# Altium PCB Counts_PCB.PcbDoc (part 3 of 3)
Units mil, origin at the board's own origin, x right, y up, seen from the top; angles counter-clockwise.
Board outline 3474.97 x 2159.98 mil, 2 copper layers (Top Layer, Bottom Layer); 185 components, 97 nets, 569 pads, 211 vias.
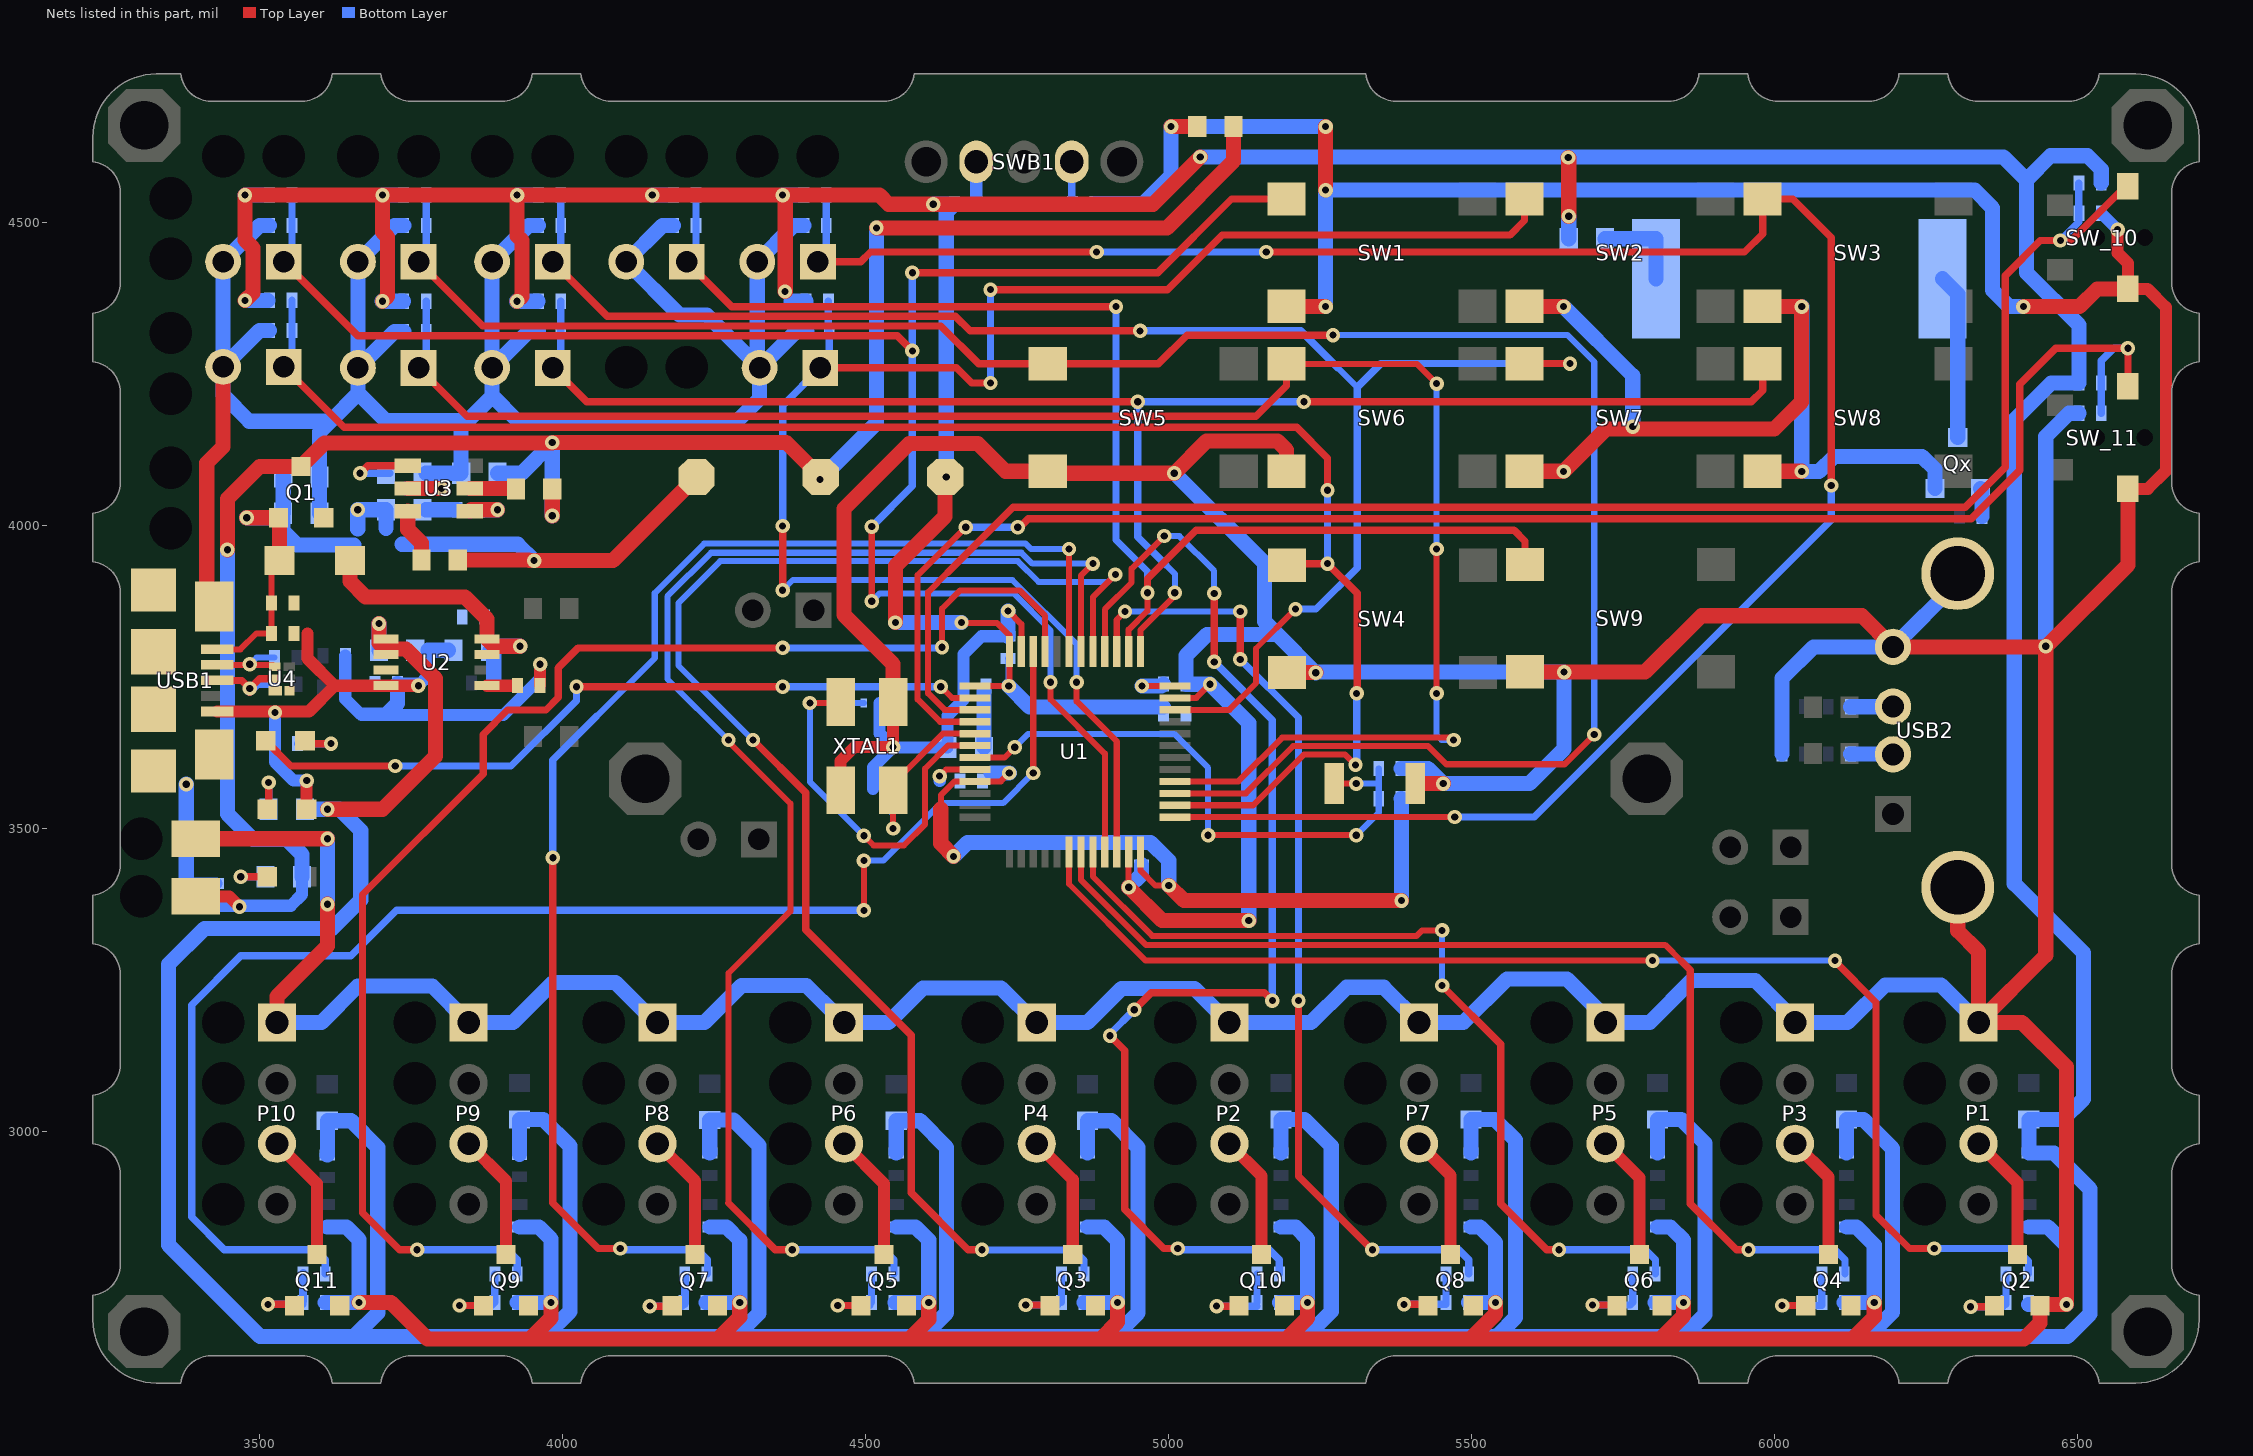
[diagram p2: the nets of this part, all layers, seen from the top]

## Via types
v1: diameter 23.62, hole 11.81, Top Layer to Bottom Layer, 211 vias

## Nets (pads, with @x,y where several pads share a name; then routed paths per layer and width w, separated by ;. In a path a pad name is that pad's centre, name@x,y a point inside that pad or via, vN(x,y) a via of type N, cw(c..) or ccw(c..) an arc to the next point about the centre after c; other vN are vias at no path point) (continued)
GND: C1.1 C2.2 C3.2 C4.2 C5.2 C6.2 C7.2 C8.2 C9.2 C10.2 C11.2 C12.2 C13.2 C14.2 C15.2 C16.2 C17.2 C18.1 C19.2 C20.2 C21.2 C22.2 C23.2 C24.2 C100.2 C101.2 C102.2 C103.2 C104.2 C105.2 C106.2 C107.2 C108.2 C109.2 C110.2 C111.2 C112.2 C113.2 C114.2 C115.2 C116.2 C117.2 C118.2 C119.2 C120.2 CF1.2 CF2.2 LED2.2 P1.1 P2.1 P3.1 P4.1 P5.1 P6.1 P7.1 P8.1 P9.1 P10.1 P15.2 P16.2 Q2.2 Q3.2 Q4.2 Q5.2 Q6.2 Q7.2 Q8.2 Q9.2 Q10.2 Q11.2 Qx.2 R1.1 R3.1 R4.1 R8.2 R10.1 R32.1 R34.1 R36.1 R38.1 R40.1 R42.1 R44.1 R46.1 R48.1 R50.1 SW1.3 SW2.3 SW3.3 SW4.3 SW5.3 SW6.3 SW7.3 SW8.3 SW9.3 SW_1.2 SW_2.2 SW_3.2 SW_4.2 SW_5.2 SW_6.2 SW_7.2 SW_8.2 SW_9.2 SW_10.2 SW_11.2 SWR2.1 U1.8 U1.23 U1.35 U1.47 U2.4 U3.5 U4.3 U4.4 USB1.5 USB1.MP1 USB1.MP2 USB1.MP3 USB1.MP4 USB1.MP5 USB1.MP6 USB2.4 USB2.MH1 USB2.MH2 XTAL1.2 XTAL1.4 | length 27664.6
  Top Layer w10: v1(4622,3586.41) 4632.99,3597.4 U1.8@4680,3597.4 ; v1(4735,3859) 4756.77,3837.23 U1.47@4756.77,3792.28 ; v1@4933.94,3403.13 U1.23@4933.94,3461.57 ; U1.35@5010.71,3715.51 5045.51,3715.51 v1(5068,3738)
  Top Layer w20: USB1.5@3430.32,3693.07 v1@3525.51,3693.07 ; v1@3526,3693.56 v1@3525.51,3693.07 ; LED2.2@3577.48,3531.85 3577.48,3578.48 v1(3578,3579) ; 3578.99,3822.01 3578.99,3780.62 3624,3735.61 ; v1(3762,3735.61) U2.4@3708.54,3735.61 3624,3735.61 ; C1.1@3962.5,3736 3962.5,3770.5 v1(3963,3771) ; XTAL1.4@4458.69,3563.17 4458.69,3611.69 4481.31,3634.31 v1(4545.31,3634.31) XTAL1.2@4545.31,3708.83 ; v1(6565.5,4488) 6565.5,4449.5 6582.44,4432.56 SW_10.2@6582.44,4390.35 6614.65,4390.35 6645,4360 6645,4090 6615.35,4060.35 SW_11.2@6582.44,4060.35 ; v1@3525.51,3693.07 3581.46,3693.07 3624,3735.61
  Top Layer w25: P15.2@3394.79,3483.01 v1(3612,3483) ; USB1.MP1@3425.39,3866.3 3413,3878.69 3413,4103 3439.94,4129.94 SW_4.2@3439.94,4261.5 ; P10.1@3528.89,3180 3528.89,3222.89 3612,3306 v1(3612,3375) ; v1(3664,2718) 3717,2718 3777,2658 3946,2658 ; U3.5@3744.66,4061 v1(3800,4061) ; v1(3980.66,2718) 3980.66,2692.66 3946,2658 ; v1(4292.33,2718) 4292.33,2694.33 4256,2658 ; XTAL1.2@4545.31,3708.83 4545.31,3771.69 4464.44,3852.56 4464.44,4027.44 4572,4135 4685,4135 4730.58,4089.42 SW5.3@4800.52,4089.42 4803.94,4086 v1(5009,4086) 5062.5,4139.5 5179.5,4139.5 5194.37,4124.63 SW6.3@5194.37,4089.42 ; v1(4604,2718) 4604,2690 4572,2658 ; v1(4915.66,2718) 4915.66,2685.66 4888,2658 ; v1(4934,3403.13) 4989.13,3348 v1(5132,3348) ; v1(5004,4658) P16.2@5044,4658 ; SW1.3@5194.37,4361.42 v1@5258.44,4361.42 ; SW4.3@5195.09,3757.42 v1@5242.57,3757.42 ; v1(5229,2718) 5229,2692.63 5194.37,2658 ; v1(5258.85,4553.15) v1(5258.85,4658) ; SWR2.1@5406.93,3574 v1(5453,3574) ; v1(5539,2718) 5539,2699 5498,2658 ; SW7.3@5587.09,4089.42 v1@5651.15,4089.42 ; SW2.3@5587.09,4361.42 v1@5651.15,4361.42 ; SW9.3@5587.8,3758.42 v1@5651.87,3758.42 ; v1(5651.57,4089) 5721.57,4159 5999,4159 6043.87,4203.87 6043.87,4361.42 SW3.3@5979.8,4361.42 ; v1(5652.28,3758) 5786,3758 5879,3851 6143.59,3851 USB2.4@6195,3799.59 v1@6447,3799.59 ; v1(5849,2718) 5849,2696 5811,2658 ; SW8.3@5979.8,4089.42 v1@6043.87,4089.42 ; v1(6164,2718) 6164,2694 6128,2658 ; USB2.MH1@6301.69,3403.13 6301.69,3331.31 6336.11,3296.89 P1.1@6336.11,3180 ; v1(6410,4361) 6502.44,4361 6531.8,4390.35 SW_10.2@6582.44,4390.35 ; SW_11.2@6582.44,4060.35 6582.44,3935.03 v1@6447,3799.59 ; 3946,2658 4256,2658 ; 4256,2658 4572,2658 ; 4572,2658 4888,2658 ; 4888,2658 5194.37,2658 ; 5194.37,2658 5498,2658 ; 5498,2658 5811,2658 ; 5811,2658 6128,2658 ; 6128,2658 6411,2658 6437.4,2684.4 Q2.2@6437.4,2712.68 6439.72,2715 v1(6481,2715) 6481,3107 6408,3180 P1.1@6336.11,3180 ; P1.1@6336.11,3180 6447,3290.89 v1@6447,3799.59
  Bottom Layer w20: C20.2@3379,3409.5 C19.2@3429,3409.5 ; v1(3525.51,3691.51) R10.1@3525.51,3640 3525.51,3609.49 3556,3579 v1(3578,3579) ; C23.2@3641.5,3785 3641.5,3713.5 3665,3690 3711,3690 ; 3668,3687 3902,3687 3963,3748 v1(3963,3771) ; C7.2@3727.5,3739 3758.61,3739 v1(3762,3735.61) 3778,3751.61 3778,3794 ; C10.2@4512.01,3565 4512.01,3601.01 v1(4545.31,3634.31) ; C9.2@4522.99,3707 4522.99,3656.62 v1(4545.31,3634.31) ; v1@4622,3578.41 v1@4622.25,3578.66 ; C16.2@4735,3817.16 4691.16,3817.16 4661.5,3787.5 C11.2@4661.5,3735.2 4661.5,3712.5 4635,3686 C15.2@4635,3633.66 4545.95,3633.66 v1(4545.31,3634.31) ; C109.2@6538.5,4515 v1(6565.5,4488)
  Bottom Layer w25: C20.2@3379,3409.5 v1(3379,3573) ; C103.2@3516.5,4321.5 3499.94,4321.5 SW_4.2@3439.94,4261.5 ; C100.2@3516.5,4495 3499.94,4495 SW_1.2@3439.94,4435 SW_4.2@3439.94,4261.5 ; P10.1@3528.89,3180 3602,3180 3662,3240 3785,3240 P9.1@3845,3180 3918.11,3180 3984.11,3246 4087,3246 4153,3180 P8.1@4156.67,3180 4234.22,3180 4295.22,3241 4402,3241 4450.78,3192.22 4465,3192.22 4477.22,3180 4537.56,3180 4594.56,3237 4723.56,3237 P4.1@4780.56,3180 ; R1.1@3598.89,4020 3599.06,4020.17 C3.2@3599.06,4080 3599.06,4154.06 3617,4172 ; R50.1@3608.5,2718 v1(3664,2718) 3664,2822 3643.5,2842.5 C120.2@3611.64,2842.5 ; v1(3612,3375) v1(3612,3483) ; 3711,3690 3727.5,3706.5 C7.2@3727.5,3739 ; C105.2@3738,4320 3722.44,4320 SW_6.2@3662.44,4260 ; C104.2@3738,4495 3722.44,4495 SW_5.2@3662.44,4435 SW_6.2@3662.44,4260 ; C4.2@3774.66,4026 R4.1@3826.16,4026 ; R3.1@3774.66,4086 C2.2@3832.66,4086 3832.66,4161.66 3844,4173 ; 3778,3794 C6.2@3812,3794 ; R46.1@3925.16,2718 v1(3980.66,2718) 3980.66,2823.03 3961.19,2842.5 C119.2@3929.25,2842.5 ; C107.2@3960,4320 3943.69,4320 SW_8.2@3883.69,4260 ; C106.2@3960,4495 3943.69,4495 SW_7.2@3883.69,4435 SW_8.2@3883.69,4260 ; C108.2@4183,4495 4164.94,4495 SW_9.2@4104.94,4435 4192.94,4347 4237.94,4347 SW_2.2@4321.19,4263.75 ; R42.1@4236.83,2718 v1(4292.33,2718) 4292.33,2820.67 4270.5,2842.5 C118.2@4242.92,2842.5 ; C102.2@4398,4495 4381.19,4495 SW_3.2@4321.19,4435 SW_2.2@4321.19,4263.75 ; C101.2@4403,4320 4384.94,4320 SW_2.2@4324.94,4260 ; R38.1@4548.5,2718 v1(4604,2718) 4604,2821 4582.5,2842.5 C117.2@4550.69,2842.5 ; C16.2@4735,3817.16 v1(4735,3859) ; P4.1@4782.22,3180 4866,3180 4922,3236 5042.33,3236 P2.1@5098.33,3180 ; R34.1@4860.16,2718 v1(4915.66,2718) 4915.66,2820.34 4893.5,2842.5 C116.2@4865.97,2842.5 ; R8.2@4878.5,4531 4958,4531 5004,4577 v1(5004,4658) v1(5258.85,4658) ; v1(4934,3403.13) 4955,3424.13 C12.2@4955,3440.16 ; v1(5009,4086) 5010,4086 5158,3938 5158,3841.57 5179.57,3820 ; P2.1@5100,3180 5235,3180 5293,3238 5354.78,3238 P7.1@5412.78,3180 5485.89,3180 5557.89,3252 5656.89,3252 P5.1@5728.89,3180 ; v1(5132,3348) 5132,3674 v1(5068,3738) 5029.16,3738 C14.2@5028.5,3738.66 5028.5,3785.5 5063,3820 5179.57,3820 ; R48.1@5182.5,2718 v1(5229,2718) 5229,2823 5209.5,2842.5 C115.2@5185.25,2842.5 ; v1(5258.85,4361) v1(5258.85,4553.15) 6329.85,4553.15 6359,4524 6359,4388 6386,4361 v1(6410,4361) ; C18.1@5383.5,3599 5428,3599 v1(5453,3574) 5595,3574 5652.28,3631.28 v1(5652.28,3758) 5243.57,3758 v1(5242.57,3757) 5179.57,3820 ; R44.1@5494.5,2718 v1(5539,2718) 5539,2817 5513.5,2842.5 C114.2@5498.53,2842.5 ; v1(5651.57,4361) 5765.5,4247.07 v1(5765.5,4163) ; P5.1@5720.56,3180 P5.1@5728.89,3180 ; R40.1@5802.5,2718 v1(5849,2718) 5849,2821 5827.5,2842.5 C113.2@5806.31,2842.5 ; CF1.2@6012,3623 CF2.2@6012,3701.25 6012,3748 6063.59,3799.59 USB2.4@6195,3799.59 6301.69,3906.28 USB2.MH2@6301.69,3920.46 ; P3.1@6033.33,3180 P3.1@6036.67,3180 ; v1(6044.28,4361) v1(6044.28,4089) 6073,4089 6098,4114 6243,4114 6264.3,4092.7 Qx.2@6264.3,4060.68 ; R36.1@6114.5,2718 v1(6164,2718) 6164,2813 6134.5,2842.5 C112.2@6118.58,2842.5 ; P1.1@6336.11,3180 6274.11,3242 6182,3242 6120,3180 P3.1@6036.67,3180 ; R32.1@6418.5,2715 v1(6481,2715) 6481,2812 6450.5,2842.5 C111.2@6418.75,2842.5 ; v1(6447,3800.59) 6447,4147 6485,4185 C110.2@6501.5,4185 ; SW_4.2@3439.94,4261.5 3439.94,4215.06 3483,4172 3617,4172 ; 3617,4172 3662.44,4217.44 3662.44,4218.56 ; 3662.44,4218.56 3708,4173 3844,4173 ; 3662.44,4218.56 SW_6.2@3662.44,4260 ; 3844,4173 3883.69,4212.69 3883.69,4214.31 ; 3883.69,4214.31 SW_8.2@3883.69,4260 ; 3883.69,4214.31 3926,4172 4288,4172 4324.94,4208.94 SW_2.2@4324.94,4260 ; SW_2.2@4321.19,4263.75 SW_2.2@4324.94,4260 ; P5.1@5728.89,3180 5793.67,3180 5862.67,3249 5967.67,3249 P3.1@6036.67,3180
ISET: R3.2 U3.4 | length 132.5
  Top Layer w12: v1(3666,4086) 3678.4,4098.4 U3.4@3744.66,4098.4
  Bottom Layer w12: v1(3666,4086) R3.2@3714.66,4086
LCTRL1: R31.1 U1.18 | length 2123.2
  Top Layer w10: U1.18@4835.51,3461.57 4835.51,3408.49 4962,3282 v1(5798,3282) v1@5798,3284
  Top Layer w12: v1@6098.61,3281.39 6167,3213 6167,2862 6222,2807 v1(6263,2807)
  Bottom Layer w10: v1(5798,3282) v1(6099.22,3282)
  Bottom Layer w12: v1(6263,2807) 6398,2807 6418.5,2786.5 R31.1@6418.5,2765
LCTRL2: R35.1 U1.19 | length 1815.8
  Top Layer w10: U1.19@4855.2,3461.57 4855.2,3415.14 4962.33,3308 5819,3308 5846,3281
  Top Layer w12: 5846,3281 5860.56,3266.44 5860.56,2880.99 5936.56,2805 v1(5956.56,2805)
  Bottom Layer w12: v1(5956.56,2805) 6099.22,2805 6115.72,2788.5 R35.1@6115.72,2765
LCTRL3: R39.1 U1.20 | length 1469.2
  Top Layer w10: U1.20@4874.88,3461.57 4874.88,3420.83 4972.71,3323 5409,3323 5418,3332 v1(5451,3332)
  Top Layer w12: v1(5451,3241) 5547.78,3144.22 5547.78,2880.99 5623.78,2805 v1(5643.78,2805)
  Bottom Layer w10: v1(5451,3241) v1(5451,3332)
  Bottom Layer w12: v1(5643.78,2805) 5786.44,2805 5802.94,2788.5 R39.1@5802.94,2765
LCTRL4: R43.1 U1.39 | length 1595.7
  Top Layer w10: U1.39@4914.25,3792.28 4914.25,3844.25 v1(4928,3858)
  Top Layer w12: v1(5118,3779) v1(5118,3858) ; v1(5214,3216) 5214,2926.25 5335.25,2805 v1(5336,2805)
  Bottom Layer w10: v1(4928,3858) v1(5118,3858) v1@5119,3858
  Bottom Layer w12: v1(5118,3779) 5214,3683 v1(5214,3216) ; v1(5336,2805) 5478.67,2805 5495.17,2788.5 R43.1@5495.17,2765
LCTRL5: R47.1 U1.40 | length 1999.8
  Top Layer w10: U1.40@4894.57,3792.28 4894.57,3861.57 4938.89,3905.89 4938.89,3928.89 v1(4992.5,3982.5)
  Top Layer w12: v1(4903,3158) 4927.23,3133.77 4927.23,2871.77 4992,2807 v1(5015,2807) ; v1(4943,3201) 4971,3229 5158,3229 v1(5171,3216) ; v1(5075,3775) v1(5075,3888)
  Bottom Layer w10: v1(4992.5,3982.5) 5017.5,3982.5 5075,3925 v1(5075,3888)
  Bottom Layer w12: v1(4903,3158) 4903,3161 v1(4943,3201) ; v1(5015,2807) 5017,2805 5165.89,2805 5182.39,2788.5 R47.1@5182.39,2765 ; v1(5075,3775) 5171,3679 v1(5171,3216)
LCTRL6: R33.1 U1.41 | length 2397.4
  Top Layer w10: U1.41@4874.88,3792.28 4874.88,3881.88 v1(4912,3919)
  Top Layer w12: v1(4314,3646) 4401,3559 4401,3333 4575,3159 4575,2899 4669,2805 v1(4692,2805)
  Bottom Layer w10: v1(4314,3646) 4191,3769 4191,3872 4260,3941 4751.2,3941 4785.2,3907 4900,3907 v1(4912,3919)
  Bottom Layer w12: v1(4692,2805) 4692.5,2804.5 4843.61,2804.5 4860.11,2788 R33.1@4860.11,2764.5
LCTRL7: R37.1 U1.42 | length 2357.3
  Top Layer w10: 4273.67,2882.33 4273.67,3261.42 4375.78,3363.53 4375.78,3541.22 4273.67,3643.33 v1(4273.67,3646) ; U1.42@4855.2,3792.28 4855.2,3917.32 v1(4874.88,3937)
  Top Layer w12: 4273.67,2882.33 4351,2805 v1(4379,2805)
  Bottom Layer w10: v1(4273.67,3646) 4173,3746.67 4173,3883 4245,3955 4757,3955 4775,3937 v1(4874.88,3937) ; v1@4872.88,3941 v1@4874.88,3943
  Bottom Layer w12: v1(4379,2805) 4530.33,2805 4546.83,2788.5 R37.1@4546.83,2765
LCTRL8: R41.1 U1.43 | length 2283.1
  Top Layer w10: U1.43@4835.51,3792.28 v1(4835.51,3961)
  Top Layer w12: v1(3983.9,3451.9) 3983.9,2882.1 4059,2807 v1(4095,2807)
  Bottom Layer w10: 4056,3685 4152,3781 4152,3888.46 4233.54,3970 4764,3970 4773,3961 v1(4835.51,3961)
  Bottom Layer w12: v1(3983.9,3451.9) 3983.9,3612.9 4056,3685 ; v1(4095,2807) 4097,2805 4222.56,2805 4239.06,2788.5 R41.1@4239.06,2765
LCTRL9: R45.1 U1.45 | length 2346.9
  Top Layer w10: v1(4626,3799) 4626,3863 4656,3893 4754,3893 4796.14,3850.86 U1.45@4796.14,3792.28
  Top Layer w12: v1(3760,2805) 3731,2805 3670,2866 3670,3391 3868.94,3589.94 3868.94,3655.28 3909.16,3695.5 3972.5,3695.5 3993,3716 3993,3765 4026,3798 v1(4363,3798)
  Bottom Layer w12: v1(3760,2805) 3908.66,2805 3925.16,2788.5 R45.1@3925.16,2765 ; v1(4363,3798) v1@4623,3798
LCTRL10: R49.1 U1.46 | length 2420.2
  Top Layer w10: v1@4496,3365 4497,3366 v1(4497,3447) ; v1(4776.46,3591.72) U1.46@4776.46,3792.28
  Bottom Layer w10: v1@4495,3447 v1(4497,3447) 4529,3447 4624,3542 4726.74,3542 v1(4776.46,3591.72)
  Bottom Layer w12: R49.1@3608.5,2765 3608.5,2788.5 3592,2805 3442,2805 3388,2859 3388,3209 3469,3290 3651,3290 3726,3365 v1@4496,3365
  other v1: 4497,3365
LED1#: P1.3 Q2.3 | length 209.1
  Top Layer w20: P1.3@6336.11,2980 6400,2916.11 Q2.3@6400,2797.32
LED2#: P3.3 Q4.3 | length 205.5
  Top Layer w20: P3.3@6033.33,2980 6088.33,2925 Q4.3@6088.33,2797.32
LED3#: P5.3 Q6.3 | length 205.9
  Top Layer w20: P5.3@5720.56,2980 5776.66,2923.89 Q6.3@5776.66,2797.32
LED4#: P7.3 Q8.3 | length 204.3
  Top Layer w20: P7.3@5412.78,2980 5465,2927.78 Q8.3@5465,2797.32
LED5#: P2.3 Q10.3 | length 204.8
  Top Layer w20: P2.3@5100,2980 5153.33,2926.67 Q10.3@5153.33,2797.32
LED6#: P4.3 Q3.3 | length 207.3
  Top Layer w20: P4.3@4782.22,2980 4841.66,2920.56 Q3.3@4841.66,2797.32
LED7#: P6.3 Q5.3 | length 209.8
  Top Layer w20: P6.3@4464.44,2980 4530,2914.45 Q5.3@4530,2797.32
LED8#: P8.3 Q7.3 | length 208.2
  Top Layer w20: P8.3@4156.67,2980 4218.33,2918.34 Q7.3@4218.33,2797.32
LED9#: P9.3 Q9.3 | length 208.2
  Top Layer w20: P9.3@3845,2980 3906.66,2918.34 Q9.3@3906.66,2797.32
LED10#: P10.3 Q11.3 | length 210.1
  Top Layer w20: P10.3@3528.89,2980 3594.99,2913.9 Q11.3@3594.99,2797.32
NetC1_2: C1.2 U2.5 | length 48.6
  Top Layer w20: U2.5@3875.46,3735.61 C1.2@3924.11,3735.61
NetLED1_2: LED1.2 R10.2 | length 100.6
  Top Layer w12: LED1.2@3575,3645 3580,3640 v1(3618,3640)
  Bottom Layer w12: R10.2@3562.51,3640 v1(3618,3640)
NetLED2_1: LED2.1 R5.1 | length 100.7
  Top Layer w12: LED2.1@3512.52,3531.85 3509,3535.37 3515,3541.37 v1(3515,3576)
  Bottom Layer w12: R5.1@3509,3537.85 R5.1@3515,3531.85 v1(3515,3576)
NetLED3_1: LED3.1 R6.1 | length 84.5
  Top Layer w12: v1(3469,3420.5) LED3.1@3512.52,3420.5
  Bottom Layer w12: v1(3469,3420.5) R6.1@3510,3420.5
NetLS1_1: LS1.1 Rv.1 | length 150
  Bottom Layer w25: Rv.1@5720,4473 5804,4473 LS1.1@5804,4407
NetLS1_2: LS1.2 Qx.3 | length 272.1
  Bottom Layer w25: LS1.2@6276.44,4407 6301.7,4381.74 Qx.3@6301.7,4145.32
NetQ2_1: Q2.1 R31.2 R32.2 | length 188.1
  Top Layer w12: v1@6324,2711 Q2.1@6361.94,2711
  Bottom Layer w12: v1(6323,2711) R32.2@6376.16,2711 ; R32.2@6381.16,2716 R31.2@6381.16,2763 ; R32.2@6381.5,2715 R31.2@6381.5,2765
NetQ3_1: Q3.1 R33.2 R34.2 | length 138.1
  Top Layer w12: v1@4765,2714 Q3.1@4802.94,2714
  Bottom Layer w12: v1(4764,2714) R34.2@4817.16,2714 ; R34.2@4823.16,2718 R33.2@4823.16,2765
NetQ4_1: Q4.1 R35.2 R36.2 | length 155.4
  Top Layer w12: v1@6013,2713 Q4.1@6050.94,2713
  Bottom Layer w12: v1(6012,2713) 6077.5,2713 R36.2@6077.5,2718 R35.2@6077.5,2765
NetQ5_1: Q5.1 R37.2 R38.2 | length 138.1
  Top Layer w12: v1@4455,2713 Q5.1@4492.94,2713
  Bottom Layer w12: v1(4454,2713) R38.2@4507.16,2713 ; R38.2@4509.5,2718 R37.2@4509.5,2765
NetQ6_1: Q6.1 R39.2 R40.2 | length 158.8
  Top Layer w12: v1@5700,2714 Q6.1@5737.94,2714
  Bottom Layer w12: v1@5703,2718 v1(5699,2714) 5761.5,2714 R40.2@5765.5,2718 R39.2@5765.5,2765
NetQ7_1: Q7.1 R41.2 R42.2 | length 188.1
  Top Layer w12: v1@4145,2712 Q7.1@4182.94,2712
  Bottom Layer w12: v1(4144,2712) R42.2@4197.16,2712 ; R42.2@4201.5,2715 R41.2@4201.5,2765 ; R42.2@4202.16,2717 R41.2@4202.16,2764
NetQ8_1: Q8.1 R43.2 R44.2 | length 154.4
  Top Layer w12: v1@5389,2715 Q8.1@5426.94,2715
  Bottom Layer w12: v1(5388,2715) R44.2@5457.5,2715 ; R44.2@5457.5,2718 R43.2@5457.5,2765
NetQ9_1: Q9.1 R45.2 R46.2 | length 148
  Top Layer w12: v1(3830,2713) 3831,2713 3868.94,2713 Q9.1@3869.26,2712.68
  Top Layer w20: v1@3830,2714 v1@3831,2713
  Bottom Layer w12: v1(3830,2713) 3883.16,2713 R46.2@3888.16,2718 R45.2@3888.16,2765
NetQ10_1: Q10.1 R47.2 R48.2 | length 151.4
  Top Layer w12: v1@5080,2712 Q10.1@5117.94,2712
  Bottom Layer w12: v1(5079,2712) R48.2@5145.5,2712 ; R48.2@5145.5,2718 R47.2@5145.5,2765
NetQ11_1: Q11.1 R49.2 R50.2 | length 188.1
  Top Layer w12: v1@3515,2715 Q11.1@3552.94,2715
  Bottom Layer w12: v1(3514,2715) R50.2@3567.16,2715 ; R50.2@3571.5,2715 R49.2@3571.5,2765 ; R50.2@3572.16,2720 R49.2@3572.16,2767
NetQx_1: Qx.1 Rb.1 | length 46.7
  Bottom Layer w25: Qx.1@6339.1,4060.68 6341.5,4058.28 Rb.1@6341.5,4015
NetR7_1: R7.1 SWB1.1 | length 70.4
  Bottom Layer w12: R7.1@4682.52,4530.98 R7.1@4683.5,4530
  Bottom Layer w20: R7.1@4682.52,4530.98 SWB1.1@4682.52,4600
NetR8_1: R8.1 SWB1.3 | length 69.6
  Bottom Layer w12: SWB1.3@4840,4600 4840,4532.5 R8.1@4841.5,4531
NetRF1_2: RF1.2 USB2.2 | length 70.2
  Bottom Layer w25: RF1.2@6125,3623 6194.43,3623 USB2.2@6195,3622.43
NetRF2_2: RF2.2 USB2.3 | length 70.1
  Bottom Layer w25: RF2.2@6125,3701 6194.83,3701 USB2.3@6195,3701.17
NetSB6_1: SB6.1 U3.2 | length 72.8
  Top Layer w25: U3.2@3847.02,4061 3917,4061 SB6.1@3919,4063
NetSB7_2: SB7.2 U3.6 | length 89.9
  Top Layer w25: U3.6@3744.66,4023.6 3744.66,3993.34 3767,3971 SB7.2@3767,3943
RST#: C18.2 R9.1 SWR2.2 U1.7 | length 981.1
  Top Layer w10: U1.7@4680,3617.09 4729.09,3617.09 v1(4746,3634) ; v1(5065,3489) v1(5309.31,3489) v1@5312,3489 ; SWR2.2@5273.07,3574 v1(5309.31,3574)
  Bottom Layer w10: v1(4746,3634) 4768,3656 5009,3656 5065,3600 v1(5065,3489) ; v1(5309.31,3489) 5346.5,3526.19 R9.1@5346.5,3549 5346.5,3574 ; v1(5309.31,3574) 5346.5,3574 ; C18.2@5346.5,3599 5346.5,3574
TEST#: LED1.1 U1.2 | length 1262.8
  Top Layer w10: v1(4624,3734) 4642.49,3715.51 U1.2@4680,3715.51
  Top Layer w12: LED1.1@3510.04,3645 3552.04,3603 v1(3724,3603) ; v1(4023,3734) v1(4363,3734)
  Bottom Layer w12: v1(3724,3603) 3915,3603 4023,3711 v1(4023,3734) ; v1(4363,3734) v1(4624,3734)
TS: R4.2 U3.1 | length 76.1
  Top Layer w25: U3.1@3847.02,4023.6 3849.42,4026 v1(3892.66,4026)
  Bottom Layer w25: R4.2@3863.16,4026 v1(3892.66,4026)
TS_1: C100.1 R53.1 SW1.1 SW_1.1 U1.21 | length 3169.2
  Top Layer w10: v1(4510,3875) v1(4510,3998) ; v1(4805,3741.2) 4805,3713 4894.57,3623.43 U1.21@4894.57,3461.57
  Top Layer w12: SW_1.1@3539.94,4435 3661.94,4313 4552,4313 v1(4577,4288) ; v1(4577,4417) 4982,4417 5103.58,4538.58 SW1.1@5194.37,4538.58
  Bottom Layer w10: v1(4510,3875) 4523,3888 4744,3888 4805,3827 v1(4805,3741.2)
  Bottom Layer w12: SW_1.1@3539.94,4435 3553.5,4448.56 C100.1@3553.5,4495 R53.1@3553.5,4545 ; v1(4510,3998) 4577,4065 v1(4577,4288) ; v1@4577,4292 v1@4577,4411
TS_2: C101.1 R54.1 SW2.1 SW_2.1 U1.22 | length 2826.2
  Top Layer w10: v1(4848,3741.2) 4848,3710 4914.25,3643.75 U1.22@4914.25,3461.57
  Top Layer w12: v1(4363,3999) 4363,3897.21 v1@4367.21,3893 ; SW_2.1@4424.94,4260 4650,4260 4675,4235 v1(4706,4235) ; v1(4706,4389) 4998,4389 5088,4479 5563,4479 5587.09,4503.09 SW2.1@5587.09,4538.58
  Bottom Layer w10: v1(4363,3893) 4380,3910 4741.8,3910 4848,3803.8 v1(4848,3741.2)
  Bottom Layer w12: v1(4363,3999) 4363,4198.06 SW_2.1@4424.94,4260 4440,4275.06 C101.1@4440,4320 4438.5,4321.5 R54.1@4438.5,4370 ; v1(4706,4235) v1(4706,4389)
TS_3: C102.1 R55.1 SW3.1 SW_3.1 U1.25 | length 3642
  Top Layer w10: U1.25@5010.71,3518.66 5471.66,3518.66 v1(5472,3519)
  Top Layer w12: SW_3.1@4421.19,4435 4492,4435 4508,4451 v1(4881,4451) ; v1(5161,4451) 5950,4451 5979.8,4480.8 SW3.1@5979.8,4538.58 6029.42,4538.58 6093,4475 v1(6093,4066)
  Bottom Layer w12: SW_3.1@4421.19,4435 4435,4448.81 C102.1@4435,4495 R55.1@4435,4545 ; v1(4881,4451) v1(5161,4451) ; v1(5472,3519) 5603,3519 6093,4009 v1(6093,4066)
TS_4: C103.1 R56.1 SW4.1 SW_4.1 U1.26 | length 2834
  Top Layer w10: U1.26@5010.71,3538.35 5139.35,3538.35 5223,3622 5291,3622 v1(5308,3605)
  Top Layer w12: SW_4.1@3539.94,4261.5 3639.44,4162 5211,4162 5262,4111 v1(5262,4058) ; SW4.1@5195.09,3934.58 5197.51,3937 v1(5262,3937) 5311,3888 v1@5311,3723
  Bottom Layer w12: SW_4.1@3539.94,4261.5 3553.5,4275.06 C103.1@3553.5,4321.5 R56.1@3553.5,4371.5 ; v1(5262,3937) v1(5262,4058) ; v1(5308,3605) 5310,3607 v1(5310,3723)
TS_5: C104.1 R57.1 SW5.1 SW_5.1 U1.27 | length 3533.7
  Top Layer w10: U1.27@5010.71,3558.03 5127.03,3558.03 5205,3636 5428,3636 5458,3606 5653,3606 v1(5702,3655)
  Top Layer w12: SW_5.1@3762.44,4435 3868.44,4329 4624,4329 4686.42,4266.58 SW5.1@4800.52,4266.58 4982.58,4266.58 5030,4314 v1(5271,4314)
  Bottom Layer w10: v1(5271,4314) 5658,4314 5702,4270 v1(5702,3655)
  Bottom Layer w12: SW_5.1@3762.44,4435 3775,4447.56 C104.1@3775,4495 R57.1@3775,4545
TS_6: C105.1 R58.1 SW6.1 SW_6.1 U1.28 | length 3000.7
  Top Layer w10: U1.28@5010.71,3577.72 5114.72,3577.72 5187,3650 5466,3650 v1(5470,3646) ; SW6.1@5194.37,4266.58 5409.42,4266.58 v1(5442,4234) ; v1(5442,3723) v1(5442,3961)
  Top Layer w12: SW_6.1@3762.44,4260 3842.44,4180 5144,4180 5194.37,4230.37 SW6.1@5194.37,4266.58
  Bottom Layer w10: v1(5442,3723) 5442,3654 5450,3646 v1(5470,3646) ; v1(5442,3961) v1(5442,4234)
  Bottom Layer w12: SW_6.1@3762.44,4260 3775,4272.56 C105.1@3775,4320 R58.1@3775,4370
TS_7: C106.1 R59.1 SW7.1 SW_7.1 U1.34 | length 2699.6
  Top Layer w10: U1.34@5010.71,3695.83 5099.83,3695.83 5144,3740 5144,3797 v1(5209,3862)
  Top Layer w12: SW_7.1@3983.69,4435 4073.69,4345 4648,4345 4672,4321 v1(4952.8,4321) ; SW7.1@5587.09,4266.58 5587.51,4267 v1(5662,4267)
  Bottom Layer w10: 5279,4260 5311,4228
  Bottom Layer w12: SW_7.1@3983.69,4435 3997,4448.31 C106.1@3997,4495 R59.1@3997,4545 ; v1(4952.8,4321) 5218,4321 5279,4260 ; v1(5209,3862) 5243.11,3862 5311,3929.89 5311,4228 5350,4267 v1(5662,4267)
TS_8: C107.1 R60.1 SW8.1 SW_8.1 U1.37 | length 2646.7
  Top Layer w10: U1.37@4953.62,3792.28 4953.62,3827.82 5010,3884.2 v1(5010,3888.94)
  Top Layer w12: SW_8.1@3983.69,4260 4039.69,4204 v1(4949,4204) ; v1(5223,4204) 5961,4204 5979.8,4222.8 SW8.1@5979.8,4266.58
  Bottom Layer w10: 4995,3935 5010,3920 v1(5010,3888.94)
  Bottom Layer w12: SW_8.1@3983.69,4260 3997,4273.31 C107.1@3997,4320 R60.1@3997,4370 ; 4995,3935 4949,3981 v1(4949,4204) v1(5223,4204)
TS_9: C108.1 R61.1 SW9.1 SW_9.1 U1.38 | length 2183
  Top Layer w10: U1.38@4933.94,3792.28 4933.94,3827.94 4965,3859 v1(4965,3888.94)
  Top Layer w12: SW_9.1@4204.94,4435 4278.94,4361 v1(4913,4361) ; v1(4965,3888.94) 4965,3912 5045,3992 5569.8,3992 5587.8,3974 SW9.1@5587.8,3935.58
  Bottom Layer w12: SW_9.1@4204.94,4435 4220,4450.06 C108.1@4220,4495 R61.1@4220,4545 ; v1(4913,4361) 4913,3976 4965,3924 v1(4965,3888.94)
TS_10: C109.1 R62.1 SW_10.1 U1.3 | length 2804.8
  Top Layer w10: 4635.46,3922.46 4603,3890 4603,3723 4630.17,3695.83 U1.3@4680,3695.83
  Top Layer w12: 4635.46,3922.46 4743,4030 6314,4030 6380,4096 6380,4412 6438,4470 v1(6471,4470) 6489,4470 6578.65,4559.65 SW_10.1@6582.44,4559.65
  Bottom Layer w12: v1(6471,4470) 6501.5,4500.5 C109.1@6501.5,4515 R62.1@6501.5,4565
TS_11: C110.1 R63.1 SW_11.1 U1.4 | length 2751
  Top Layer w10: v1(4665,3997) 4585.84,3917.84 4585.84,3713.16 4622.86,3676.14 U1.4@4680,3676.14
  Top Layer w12: v1@4754,3997 4768,4011 6324,4011 6404,4091 6404,4233 6463.44,4292.44 v1(6582.44,4292.44) SW_11.1@6582.44,4229.65
  Bottom Layer w12: v1(4665,3997) v1(4751,3997) v1@4754,3997 ; C110.1@6538.5,4185 R63.1@6538.5,4235 6538.5,4271.5 6559.44,4292.44 v1(6582.44,4292.44)
USB_D+: R52.2 U4.2 USB1.3 | length 156.7
  Top Layer w10: USB1.3@3430.32,3744.25 USB1.3@3433.07,3747.01
  Top Layer w12: USB1.3@3430.32,3744.25 3470.75,3744.25 v1(3484,3731) 3500.01,3747.01 U4.2@3525,3747.01 ; v1@3484,3725 v1@3484,3725.14
  Bottom Layer w12: v1@3484,3725 3497,3738 R52.2@3524.5,3738
USB_D-: R51.2 U4.1 USB1.2 | length 141
  Top Layer w10: USB1.2@3430.32,3769.84 3521.85,3769.84 U4.1@3525,3766.69
  Bottom Layer w10: v1(3484,3771) 3495,3782 R51.2@3524.5,3782
VBAT: C2.1 C19.1 C20.1 P12.1 P15.1 P16.1 Q1.3 R6.2 SB6.2 | length 3477
  Top Layer w20: P15.1@3394.79,3388.01 3449.99,3388.01 v1(3467,3371)
  Top Layer w25: v1(3447,3960) 3447,4044 3500.32,4097.32 Q1.3@3568.53,4097.32 3607.21,4136 v1@3983,4136 ; v1(3983,4016) SB6.2@3983,4060 ; v1(3983,4137) 4369,4137 P12.1@4426,4080 ; v1(4518,4491) 4997,4491 5107,4601 P16.1@5107,4658
  Bottom Layer w12: C20.1@3379,3372.5 C19.1@3429,3372.5
  Bottom Layer w20: C19.1@3429,3372.5 3551.5,3372.5 3570,3391 R6.2@3570,3420.5
  Bottom Layer w25: v1(3447,3960) 3447,3524 3489,3482 3545,3482 3570,3457 R6.2@3570,3420.5 ; C2.1@3892.66,4086 3932,4086 v1(3983,4137) v1(3983,4016) ; v1(4424.94,4076) 4518,4169.06 v1(4518,4491)
VCC_3V3: C7.1 C8.1 C11.1 C12.1 C13.1 C14.1 C15.1 C16.1 C17.1 P11.1 R5.2 R7.2 R9.2 R11.2 R12.2 R13.2 R14.2 R15.2 R16.2 R17.2 R18.2 R19.2 R20.2 R21.2 R22.2 R23.2 R24.2 R25.2 R26.2 R27.2 R28.2 R29.2 R30.2 R53.2 R54.2 R55.2 R56.2 R57.2 R58.2 R59.2 R60.2 R61.2 R62.2 R63.2 Rv.2 U1.1 U1.9 U1.24 U1.36 U1.48 U2.1 U2.2 U2.3 | length 18596.5
  Top Layer w10: 4624,3532 4624,3555 4646.72,3577.72 U1.9@4680,3577.72 4723,3577.72 v1(4737,3591.72) ; v1@4658,3839 4717,3839 4737.09,3818.91 U1.48@4737.09,3792.28 4737.09,3736.28 v1(4736,3735.2) U1.1@4680,3735.2 ; v1@4950,3735.2 4953.62,3731.57 4957.24,3735.2 U1.36@5010.71,3735.2 ; U1.24@4953.62,3461.57 4953.62,3430.38 4978,3406 v1(5000,3406)
  Top Layer w25: v1(3476,4371) 3489,4384 3489,4458 3476,4471 v1(3476,4545) v1(3703,4545) ; v1(3612,3531.85) 3702.85,3531.85 3790.31,3619.31 3790.31,3747.34 3741.65,3796 3721,3796 ; v1(3697,3838) 3697,3806 3707,3796 ; v1(3703,4370) 3711,4378 3711,4476 3703,4484 v1(3703,4545) ; v1(3925,4370) 3933,4378 3933,4470 3925,4478 v1(3925,4545) ; v1(4367,4386) 4367.21,4386.21 4367.21,4540.79 v1(4363,4545) ; v1(4549,3840) 4549,3933 4631,4015 P11.1@4631,4080 ; 4624,3532 4624,3475 v1(4645,3454) ; v1(5000,3406) 5025,3381 v1(5384,3381) ; v1(5052,4608) 4974,4530 v1(4611.5,4530) 4537.58,4530 4522.58,4545 v1(4363,4545) ; v1(5659,4607) 5660,4606 v1(5660,4510) ; v1(3703,4545) v1(3925,4545) ; v1(3925,4545) v1(4148,4545) v1(4363,4545)
  Bottom Layer w10: 4722,3735.2 v1(4736,3735.2) 4736,3779.16 C16.1@4735,3780.16
  Bottom Layer w25: v1(3476,4545) R53.2@3516.5,4545 ; v1@3479,4371 R56.2@3514,4371 ; R5.2@3575,3531.85 v1(3612,3531.85) 3632.15,3531.85 3667,3497 3667,3382 3620,3335 3409,3335 3350,3276 3350,2813 3501,2662 3656,2662 ; R29.2@3611.64,2961.5 3611.89,2961.75 R30.2@3611.89,3018 3651,3018 3695,2974 3695,2701 3656,2662 ; C8.1@3697,3794 v1(3697,3838) ; v1@3702,4370 v1(3703,4370) R58.2@3737,4370 ; v1(3703,4545) R57.2@3738,4545 ; v1@3924,4370 v1(3925,4370) R60.2@3959,4370 ; v1(3925,4545) R59.2@3960,4545 ; R27.2@3929,2962.5 R28.2@3929,3020 3968.11,3020 4012.11,2976 4012.11,2703 3973.11,2664 ; v1(4148,4545) R61.2@4183,4545 ; R25.2@4242.67,2964.5 R26.2@4242.67,3019 4281.78,3019 4324,2976.78 4324,2700.22 4286.78,2663 ; v1(4363,4545) R55.2@4398,4545 ; 4377,4370 R54.2@4401.5,4370 ; v1(4549,3840) v1(4658,3840) ; R23.2@4550.44,2964.5 R24.2@4550.44,3018 4589.56,3018 4633.56,2974 4633.56,2701 4594.56,2662 ; v1(4611.5,4530) R7.2@4646.5,4530 4633,4516.5 v1(4633,4080) ; v1@4645.05,3453.95 4668.27,3477.16 C12.1@4955,3477.16 4969.84,3477.16 5000,3447 v1(5000,3406) ; C15.1@4695,3633.66 C11.1@4695,3726 ; 4707.28,3591.72 v1(4737,3591.72) ; v1(4736,3735.2) 4770.54,3700.66 C17.1@4991.5,3700.66 ; R21.2@4866.22,2964.5 R22.2@4866.22,3018 4905.33,3018 4949.33,2974 4949.33,2701 4910.33,2662 ; v1@4955.8,3735 v1(4956,3735.2) 4988.04,3735.2 C14.1@4991.5,3738.66 ; v1(5052,4608) 6377,4608 6415,4570 ; R19.2@5185,2964.5 R20.2@5185,3020 5224.11,3020 5268.11,2976 5268.11,2703 5229.11,2664 ; R9.2@5383.5,3549 5384,3548.5 v1(5384,3381) ; R17.2@5498.78,2964.5 R18.2@5498.78,3020 5537.89,3020 5572,2985.89 5572,2693.11 5542.89,2664 ; Rv.2@5660,4473 v1(5660,4510) ; R15.2@5806.56,2964.5 R16.2@5806.56,3020 5845.67,3020 5885,2980.67 5885,2698.33 5850.67,2664 ; R13.2@6118.33,2964.5 R14.2@6118.33,3020 6146,3020 6194,2972 6194,2702 6154,2662 ; R62.2@6538.5,4565 6538.5,4587.5 6516,4610 6455,4610 6415,4570 ; 3656,2662 4594.56,2662 ; 4594.56,2662 4910.33,2662 ; 4910.33,2662 6154,2662 ; 6154,2662 6483,2662 6520,2699 6520,2905 6460.5,2964.5 R11.2@6419,2964.5 R12.2@6419,3020 6475,3020 6509,3054 6509,3295 6395,3409 6395,4174 6456,4235 R63.2@6501.5,4235 6501.5,4330.5 6415,4417 6415,4570
VIN: C5.1 C6.1 D1.2 Q1.2 R2.2 U2.7 U2.8 | length 488.3
  Top Layer w25: D1.2@3649.07,3942 3649.07,3907.93 3675,3882 3839,3882 3875.46,3845.54 U2.8@3875.46,3812.39 3887.26,3800.59 v1(3930,3800.59)
  Bottom Layer w25: R2.2@3886.5,3740 3886.5,3787.5 C6.1@3880,3794 3886.59,3800.59 v1(3930,3800.59)
VUSB: C3.1 C4.1 C21.1 C22.1 D1.1 P13.1 Q1.1 R1.2 SB7.1 USB1.1 | length 1418.2
  Top Layer w10: USB1.1@3430.32,3795.43 3468.43,3795.43 3495.01,3822.01 C22.1@3520,3822.01 C21.1@3520,3872.01 3520,3929.07 D1.1@3532.93,3942
  Top Layer w25: v1(3479,4012.68) Q1.1@3531.13,4012.68 3532.93,4010.87 D1.1@3532.93,3942 ; SB7.1@3827,3943 3944,3943 3945,3942 v1(3953,3942) 4083,3942 P13.1@4221,4080
  Bottom Layer w25: v1(3479,4012.68) 3531.57,4012.68 R1.2@3538.89,4020 ; C3.1@3539.06,4080 3539.06,4020.17 R1.2@3538.89,4020 ; 3656,3968 3562,3968 3538.89,3991.11 R1.2@3538.89,4020 ; 3662,3994 v1(3662,4026) C4.1@3708.66,4026 3708.66,3995.34 ; 3735,3969 3926,3969 v1(3953,3942)
X0: C10.1 U1.5 XTAL1.1 | length 311.1
  Top Layer w10: v1(4545.31,3500) XTAL1.1@4545.31,3563.17 4545.31,3574.31 4627.46,3656.46 U1.5@4680,3656.46
  Bottom Layer w10: C10.1@4537.99,3565 4537.99,3531.01 4545.31,3523.69 v1(4545.31,3500)
X1: C9.1 U1.6 XTAL1.3 | length 708.1
  Top Layer w10: v1(4408,3707) 4456.86,3707 XTAL1.3@4458.69,3708.83 ; v1(4497,3488) 4513,3472 4563,3472 4598,3507 4598,3599 4635.77,3636.77 U1.6@4680,3636.77
  Bottom Layer w10: v1(4497,3488) 4408,3577 v1(4408,3707) C9.1@4497.01,3707
pads on no net: SW1.2 SW1.4 SW2.2 SW2.4 SW3.2 SW3.4 SW4.2 SW4.4 SW5.2 SW5.4 SW6.2 SW6.4 SW7.2 SW7.4 SW8.2 SW8.4 SW9.2 SW9.4 SW_10.MH1 SW_10.MP1 SW_10.MP2 SW_11.MH1 SW_11.MP1 SW_11.MP2 SWB1.MH1 SWB1.MH2 U4.5 U4.6 USB1.4 USB2.1

## Polygon pours and split planes (outlines as drawn)
no net on Top Overlay (hatched 45Degree grid 15 track 5): 3330,4070 cw(c3285,4070) 3285,4025 3220,4025 ccw(c3220,4070) 3265,4070 3265,4220 ccw(c3220,4220) 3220,4265 3220,4355 ccw(c3220,4400) 3265,4400 3265,4550 ccw(c3220,4550) 3220,4595 3285,4595 cw(c3285,4550) 3330,4550 3330,4400 cw(c3285,4400) 3285,4355 3285,4265 cw(c3285,4220) 3330,4220
no net on Top Overlay (hatched 45Degree grid 15 track 5): 3330,2780 cw(c3285,2780) 3285,2735 3220,2735 ccw(c3220,2780) 3265,2780 3265,2930 ccw(c3220,2930) 3220,2975 3220,3065 ccw(c3220,3110) 3265,3110 3265,3260 ccw(c3220,3260) 3220,3305 3285,3305 cw(c3285,3260) 3330,3260 3330,3110 cw(c3285,3110) 3285,3065 3285,2975 cw(c3285,2930) 3330,2930
no net on Top Overlay (hatched 45Degree grid 15 track 5): 6595,2780 ccw(c6640,2780) 6640,2735 6705,2735 cw(c6705,2780) 6660,2780 6660,2930 cw(c6705,2930) 6705,2975 6705,3065 cw(c6705,3110) 6660,3110 6660,3260 cw(c6705,3260) 6705,3305 6640,3305 ccw(c6640,3260) 6595,3260 6595,3110 ccw(c6640,3110) 6640,3065 6640,2975 ccw(c6640,2930) 6595,2930
no net on Top Overlay (hatched 45Degree grid 15 track 5): 6595,4070 ccw(c6640,4070) 6640,4025 6705,4025 cw(c6705,4070) 6660,4070 6660,4220 cw(c6705,4220) 6705,4265 6705,4355 cw(c6705,4400) 6660,4400 6660,4550 cw(c6705,4550) 6705,4595 6640,4595 ccw(c6640,4550) 6595,4550 6595,4400 ccw(c6640,4400) 6640,4355 6640,4265 ccw(c6640,4220) 6595,4220
no net on Top Overlay (hatched 45Degree grid 15 track 5): 3570,4649.99 ccw(c3570,4700) 3619.76,4694.99 3700.24,4694.99 ccw(c3750,4700) 3750,4649.99 3900,4649.99 ccw(c3900,4700) 3949.76,4694.99 4030.24,4694.99 ccw(c4080,4700) 4080,4649.99 ccw(c4080,4655) 4080.09,4649.99 4530,4649.99 ccw(c4530,4700) 4579.76,4694.99 ccw(c4580,4700) 4580,4694.99 4920,4694.99 ccw(c4920,4700) 4920.06,4694.99 5325.24,4694.99 ccw(c5375,4700) 5375,4649.99 ccw(c5375,4655) 5375.07,4649.99 5825,4649.99 ccw(c5825,4700) 5874.76,4694.99 5955.24,4694.99 ccw(c6005,4700) 6005,4649.99 6155,4649.99 ccw(c6155,4700) 6204.76,4694.99 6285.24,4694.99 ccw(c6335,4700) 6335,4649.99 6485,4649.99 ccw(c6485,4700) 6535.02,4700 6535.02,4750 ccw(c6530,4750) 6524.99,4750 cw(c6485,4750) 6485,4710.02 6335,4710.02 cw(c6335,4750) 6295.02,4750 ccw(c6290,4750) 6290,4755.02 6200,4755.02 ccw(c6200,4750) 6196.45,4753.55 cw(c6200,4750) 6200,4755.02 6196.45,4753.55 ccw(c6200,4750) 6194.99,4750 cw(c6155,4750) 6155,4710.02 6005,4710.02 cw(c6005,4750) 5965.02,4750 ccw(c5960,4750) 5960,4755.02 5870,4755.02 ccw(c5870,4750) 5866.45,4753.55 cw(c5870,4750) 5870,4755.02 5866.45,4753.55 ccw(c5870,4750) 5864.99,4750 cw(c5825,4750) 5825.09,4710.02 ccw(c5825,4705) 5825,4710.02 5375,4710.02 ccw(c5375,4705) 5374.93,4710.02 ccw(c5375,4750) 5375,4710.02 5374.93,4710.02 cw(c5375,4750) 5335.02,4750 ccw(c5330,4750) 5333.55,4753.55 ccw(c5330,4750) 5330,4755.02 4920,4755.02 ccw(c4920,4750) 4919.94,4755.02 4580,4755.02 ccw(c4580,4750) 4577.5,4754.35 ccw(c4575,4750) 4569.99,4750 cw(c4530,4750) 4530.07,4710.02 ccw(c4530,4705) 4530,4710.02 4080,4710.02 ccw(c4080,4705) 4079.92,4710.02 ccw(c4080,4750) 4080,4710.02 4079.92,4710.02 cw(c4080,4750) 4040.02,4750 ccw(c4035,4750) 4038.55,4753.55 ccw(c4035,4750) 4035,4755.02 cw(c4035,4750) 4038.55,4753.55 4035,4755.02 3945,4755.02 ccw(c3945,4750) 3939.99,4750 cw(c3900,4750) 3900,4710.02 3750,4710.02 cw(c3750,4750) 3710.02,4750 ccw(c3705,4750) 3708.55,4753.55 ccw(c3705,4750) 3705,4755.02 cw(c3705,4750) 3708.55,4753.55 3705,4755.02 3615,4755.02 ccw(c3615,4750) 3609.99,4750 cw(c3570,4750) 3570,4710.02 3420,4710.02 cw(c3420,4750) 3380.02,4750 ccw(c3375,4750) 3369.99,4750 3369.99,4700 ccw(c3420,4700) 3420,4649.99
no net on Top Overlay (hatched 45Degree grid 15 track 5): 3609.98,2580 ccw(c3615,2580) 3615,2574.98 3705,2574.98 ccw(c3705,2580) 3708.55,2576.45 ccw(c3705,2580) 3710.01,2580 cw(c3750,2580) 3750,2619.98 3900,2619.98 cw(c3900,2580) 3939.98,2580 ccw(c3945,2580) 3945,2574.98 4035,2574.98 ccw(c4035,2580) 4038.55,2576.45 ccw(c4035,2580) 4040.01,2580 cw(c4080,2580) 4079.91,2619.98 cw(c4080,2580) 4080,2619.98 4530,2619.98 ccw(c4530,2625) 4530.07,2619.98 ccw(c4530,2580) 4530,2619.98 4530.07,2619.98 cw(c4530,2580) 4569.98,2580 ccw(c4575,2580) 4577.5,2575.65 ccw(c4580,2580) 4580,2574.98 4920,2574.98 cw(c4920,2580) 4919.94,2574.98 4920,2574.98 5330,2574.98 ccw(c5330,2580) 5333.55,2576.45 ccw(c5330,2580) 5335.01,2580 cw(c5375,2580) 5374.93,2619.98 cw(c5375,2580) 5375,2619.98 5825,2619.98 ccw(c5825,2625) 5825.08,2619.98 ccw(c5825,2580) 5825,2619.98 5825.08,2619.98 cw(c5825,2580) 5864.98,2580 ccw(c5870,2580) 5866.45,2576.45 ccw(c5870,2580) 5870,2574.98 5960,2574.98 ccw(c5960,2580) 5965.01,2580 cw(c6005,2580) 6005,2619.98 6155,2619.98 cw(c6155,2580) 6194.98,2580 ccw(c6200,2580) 6196.45,2576.45 ccw(c6200,2580) 6200,2574.98 6290,2574.98 ccw(c6290,2580) 6295.01,2580 cw(c6335,2580) 6335,2619.98 6485,2619.98 cw(c6485,2580) 6524.98,2580 ccw(c6530,2580) 6535.01,2580 6535.01,2630 ccw(c6485,2630) 6485,2680.01 6335,2680.01 ccw(c6335,2630) 6285.24,2635.01 6204.76,2635.01 ccw(c6155,2630) 6155,2680.01 6005,2680.01 ccw(c6005,2630) 5955.24,2635.01 5874.76,2635.01 ccw(c5825,2630) 5825,2680.01 ccw(c5825,2675) 5824.91,2680.01 5375,2680.01 cw(c5375,2675) 5375.07,2680.01 5375,2680.01 ccw(c5375,2630) 5325.24,2635.01 4920,2635.01 cw(c4920,2630) 4920.06,2635.01 4920,2635.01 4580,2635.01 ccw(c4580,2630) 4579.76,2635.01 ccw(c4530,2630) 4530,2680.01 ccw(c4530,2675) 4529.93,2680.01 4080,2680.01 cw(c4080,2675) 4080.09,2680.01 4080,2680.01 ccw(c4080,2630) 4030.24,2635.01 3949.76,2635.01 ccw(c3900,2630) 3900,2680.01 3750,2680.01 ccw(c3750,2630) 3700.24,2635.01 3619.76,2635.01 ccw(c3570,2630) 3570,2680.01 3420,2680.01 ccw(c3420,2630) 3369.98,2630 3369.98,2580 ccw(c3375,2580) 3380.01,2580 cw(c3420,2580) 3420,2619.98 3570,2619.98 cw(c3570,2580)
no net on Top Overlay (solid): 6870,3890
no net on Bottom Layer "Bottom Layer-No Net" (hatched 45Degree grid 20 track 8, remove dead copper, pour order 1): 3359,2728 6565,2728 6565,4606 3359,4606
GND on Top Layer "Top Layer-GND" (hatched 45Degree grid 20 track 8, remove dead copper, pour order 2): 3359,2728 6565,2728 6565,4606 3359,4606

## Other copper
Top Layer:
  rectangle net VUSB: 3507,3913 3561,4029
  rectangle net GND: 3548,3807 3590,3890
  rectangle net VIN: 3853,3778 3898,3824
  rectangle net GND: 3345,3450 3465,3585
  rectangle net GND: 3508,3678 3566,3735
  rectangle net NetSB7_2: 3723,3919 3786,4040
  rectangle net VIN: 3591,3914 3680,3970
  rectangle net VIN: 3589,3914 3636,4029
  rectangle net GND: 3547,3808 3568.53,3887
  rectangle net VUSB: 3507,3808 3535,3929.07
  rectangle net VCC_3V3: 3681,3753 3741.65,3854
  rectangle net GND: 6105,2690 6179,2737
  rectangle net GND: 5793,2690 5864,2737
  rectangle net GND: 5482,2690 5554,2737
  rectangle net GND: 5171,2690 5244,2737
  rectangle net GND: 4859,2690 4930.66,2737
  rectangle net GND: 4547,2690 4619,2737
  rectangle net GND: 4236,2690 4307.33,2737
  rectangle net GND: 3924,2690 3995.66,2737
  rectangle net GND: 3612,2690 3679,2737
  rectangle net GND: 3365,3553.5 3465,3705
  rectangle net GND: 3365,3820 3465,3935
  rectangle net GND: 3285,3553.5 3375,3935
Bottom Layer:
  rectangle net GND: 4607,3556 4665,3661
  rectangle net VCC_3V3: 4678,3558 4716,3659
  rectangle net VCC_3V3: 4682.52,3717 4756,3787
  rectangle net VUSB: 3643,3953 3738,4049
  rectangle net VBAT: 3359,3356 3450,3384
  rectangle net GND: 3359,3397 3450,3427
  rectangle net VCC_3V3: 4596,4505 4660,4551
  rectangle net GND: 3753,4002 3846,4108
  rectangle net GND: 3795,3771 3845.5,3867
  rectangle net VIN: 3863,3727 3903,3869
  rectangle net GND: 3738,3765 3845.5,3820
  rectangle net VCC_3V3: 3677,3773 3716,3817.5
  rectangle net VCC_3V3: 3677,3721 3705,3817.5
  rectangle net VCC_3V3: 4976,3671 5003,3757
  rectangle net GND: 5014,3669 5044,3758

## Silkscreen, mask and mechanical layers (free items; w line width, h text height)
Top Overlay:
  text "POWER" at 5250,4585 h50
  text "LG On/Off" at 5625,4585 h50
  text "BP On/Off" at 6010,4585 h50
  text "Boot Switch" at 4580,4450 h50
  text "TBD2" at 3608,4338.83 h50
  text "POWER" at 3386,4337.81 h50
  text "Pause" at 3830,4338.34 h50
  text "Reset" at 4051,4338.34 h50
  text "BP On/Off" at 4268,4335 h50
  text "TBD1" at 3386,4161.32 h50
  text "Start" at 3609,4160.3 h50
  text "LG On/Off" at 4271,4160.3 h50
  text "Stop" at 3830,4156.9 h50
  text "TBD2" at 4854,3990 h50
  text "Pause" at 5644,3990 h50
  text "Start" at 5249,3989 h50
  text "VUSB" at 4148,3985 h50
  text "VBAT" at 4352,3985 h50
  text "3V3" at 4558,3985 h50
  text "Stop" at 6036,3982 h50
  text "*" at 3615,3802.01 h40
  text "TBD1" at 5249,3658 h50
  text "Reset" at 5641.33,3658 h50
  text "TEST LED" at 3645,3615 h50
  text "Board PWR" at 3645,3502.5 h50
  text "BATT PWR" at 3645,3390 h50
  text "* >>  0.1uF" at 5253,3387.14 h70
  text "NO" at 3578.89,3140 h80
  text "NO" at 3895,3140 h80
  text "NO" at 4206.67,3140 h80
  text "NO" at 4514.44,3140 h80
  text "NO" at 4832.22,3140 h80
  text "NO" at 5150,3140 h80
  text "NO" at 5462.78,3140 h80
  text "NO" at 5770.56,3140 h80
  text "NO" at 6083.33,3140 h80
  text "NO" at 6386.11,3140 h80
  text "++" at 3578.89,3040 h80
  text "++" at 3895,3040 h80
  text "++" at 4206.67,3040 h80
  text "++" at 4514.44,3040 h80
  text "++" at 4832.22,3040 h80
  text "++" at 5150,3040 h80
  text "++" at 5462.78,3040 h80
  text "++" at 5770.56,3040 h80
  text "++" at 6083.33,3040 h80
  text "++" at 6386.11,3040 h80
  text "--" at 3578.89,2940 h80
  text "--" at 3895,2940 h80
  text "--" at 4206.67,2940 h80
  text "--" at 4514.44,2940 h80
  text "--" at 4832.22,2940 h80
  text "--" at 5150,2940 h80
  text "--" at 5462.78,2940 h80
  text "--" at 5770.56,2940 h80
  text "--" at 6083.33,2940 h80
  text "--" at 6386.11,2940 h80
  text "COM" at 3578.89,2830 h60
  text "COM" at 3895,2830 h60
  text "COM" at 4206.67,2830 h60
  text "COM" at 4514.44,2830 h60
  text "COM" at 4832.22,2830 h60
  text "COM" at 5150,2830 h60
  text "COM" at 5462.78,2830 h60
  text "COM" at 5770.56,2830 h60
  text "COM" at 6083.33,2830 h60
  text "COM" at 6386.11,2830 h60
Bottom Overlay:
  drawing of 3102 lines, arcs and shapes, not listed
  text "*" at 6567,4494 h40
  text "*" at 4130,4475 h40
  text "*" at 3680.11,4474 h40
  text "*" at 3902.11,4474 h40
  text "*" at 4340.11,4474 h40
  text "*" at 3464,4473 h40
  text "*" at 3458.61,4300.5 h40
  text "*" at 3680.11,4299 h40
  text "*" at 3902.11,4299 h40
  text "*" at 4345.11,4299 h40
  text "*" at 6565,4165 h40
  text "*" at 3840,4155 h40 r180
  text "*" at 3720,3995 h40 r180
  text "*" at 3898,3824 h40
  text "*" at 4934,3720.16 h40
  text "*" at 4605,3713.66 h40
  text "*" at 3676,3677 h40
  text "*" at 5409.78,3576 h40
  text "*" at 4647,3516 h40
  text "*" at 3364,3431 h40
  text "*" at 4899,3417 h40
  text "* >>  0.1uF" at 5562,3387.14 h70
  text "ZERO CARBON FOOTPRINT" at 4545,3260 h38
  text "*" at 3959,2822 h40
  text "*" at 6449,2822 h40
  text "*" at 4580,2821 h40
  text "*" at 4896,2821 h40
  text "*" at 5215,2821 h40
  text "*" at 3641,2820 h40
  text "*" at 4272,2820 h40
  text "*" at 5529,2820 h40
  text "*" at 5831,2820 h40
  text "*" at 6148,2820 h40
Mechanical 1:
  text "Small Switches are given on board for testing purpose and will be removed in final production boards." at 6790,4321 h60
  text "Non Plated holes are given to provide loop to external wires for proper grip." at 6780,3824 h60
  text "Non Plated holes are given to provide loop to external wires for proper grip." at 6765,3398 h60
  text "Metallic Switch connections with LED." at 6765,3145 h60
  text "SW8 and SW7 are on boards, just for  / testing purpose and will be remvoed in Final prodcution boards." at 6744,2719 h60
Mechanical 2:
  lines w10: 4575,2580 ccw(c4530,2580) 4530,2625 4220,2625 4080,2625 ccw(c4080,2580) 4035,2580 3945,2580 ccw(c3900,2580) 3900,2625 3750,2625 ccw(c3750,2580) 3705,2580 3615,2580 ccw(c3570,2580) 3570,2625 3420,2625 ccw(c3420,2580) 3375,2580 3329.72,2580 cw(c3329.72,2689.72) 3220,2689.72 ; 4575,4750 cw(c4530,4750) 4530,4705 4220,4705 4080,4705 cw(c4080,4750) 4035,4750 3945,4750 cw(c3900,4750) 3900,4705 3750,4705 cw(c3750,4750) 3705,4750 3615,4750 cw(c3570,4750) 3570,4705 3420,4705 cw(c3420,4750) 3375,4750 3329.72,4750 ccw(c3329.72,4640.28) 3220,4640.28 ; 4580,2580 4920,2580 5330,2580 cw(c5375,2580) 5375,2625 5685,2625 5825,2625 cw(c5825,2580) 5870,2580 5960,2580 cw(c6005,2580) 6005,2625 6155,2625 cw(c6155,2580) 6200,2580 6290,2580 cw(c6335,2580) 6335,2625 6485,2625 cw(c6485,2580) 6530,2580 6600,2580 ; 4580,4750 4920,4750 5330,4750 ccw(c5375,4750) 5375,4705 5685,4705 5825,4705 ccw(c5825,4750) 5870,4750 5960,4750 ccw(c6005,4750) 6005,4705 6155,4705 ccw(c6155,4750) 6200,4750 6290,4750 ccw(c6335,4750) 6335,4705 6485,4705 ccw(c6485,4750) 6530,4750 6575.28,4750 ; 6550,4750 6595.28,4750 ; 3220,2689.72 ccw(c3220,2689.72) 3220,2689.72 ; 3220,2689.72 3220,2735 ccw(c3220,2780) 3265,2780 3265,2930 ccw(c3220,2930) 3220,2975 3220,3065 ccw(c3220,3110) 3265,3110 3265,3260 ccw(c3220,3260) 3220,3305 3220,3395 ccw(c3220,3440) 3265,3440 3265,3750 3265,3890 ccw(c3220,3890) 3220,3935 3220,4025 ccw(c3220,4070) 3265,4070 3265,4220 ccw(c3220,4220) 3220,4265 3220,4355 ccw(c3220,4400) 3265,4400 3265,4550 ccw(c3220,4550) 3220,4595 3220,4640.28 ; 3220,4640.28 ccw(c3220,4640.28) 3220,4640.28 ; 6595.28,2580 ccw(c6595.28,2689.72) 6705,2689.72 ; 6595.28,2580 ccw(c6595.28,2580) 6595.28,2580 ; 6595.28,4750 ccw(c6595.28,4750) 6595.28,4750 ; 6595.28,4750 cw(c6595.28,4640.28) 6705,4640.28 ; 6705,2689.72 ccw(c6705,2689.72) 6705,2689.72 ; 6705,2689.72 6705,2735 cw(c6705,2780) 6660,2780 6660,2930 cw(c6705,2930) 6705,2975 6705,3065 cw(c6705,3110) 6660,3110 6660,3260 cw(c6705,3260) 6705,3305 6705,3395 cw(c6705,3440) 6660,3440 6660,3750 6660,3890 cw(c6705,3890) 6705,3935 6705,4025 cw(c6705,4070) 6660,4070 6660,4220 cw(c6705,4220) 6705,4265 6705,4355 cw(c6705,4400) 6660,4400 6660,4550 cw(c6705,4550) 6705,4595 6705,4640.28 ; 6705,4640.28 ccw(c6705,4640.28) 6705,4640.28